# Altium PCB Thunderscope_Rev5.3.PcbDoc (part 5 of 14)
Units mil, origin at the board's own origin, x right, y up, seen from the top; angles counter-clockwise.
Board outline 3937.01 x 3838.58 mil, 6 copper layers (F.Cu, In1.Cu (GND), In2.Cu (Sign), In3.Cu (Sign), In4.Cu (GND), B.Cu), stack 60.556 mil thick; 911 components, 486 nets, 2834 pads, 2761 vias.
Unrouted connection lines stored in the file: 618.
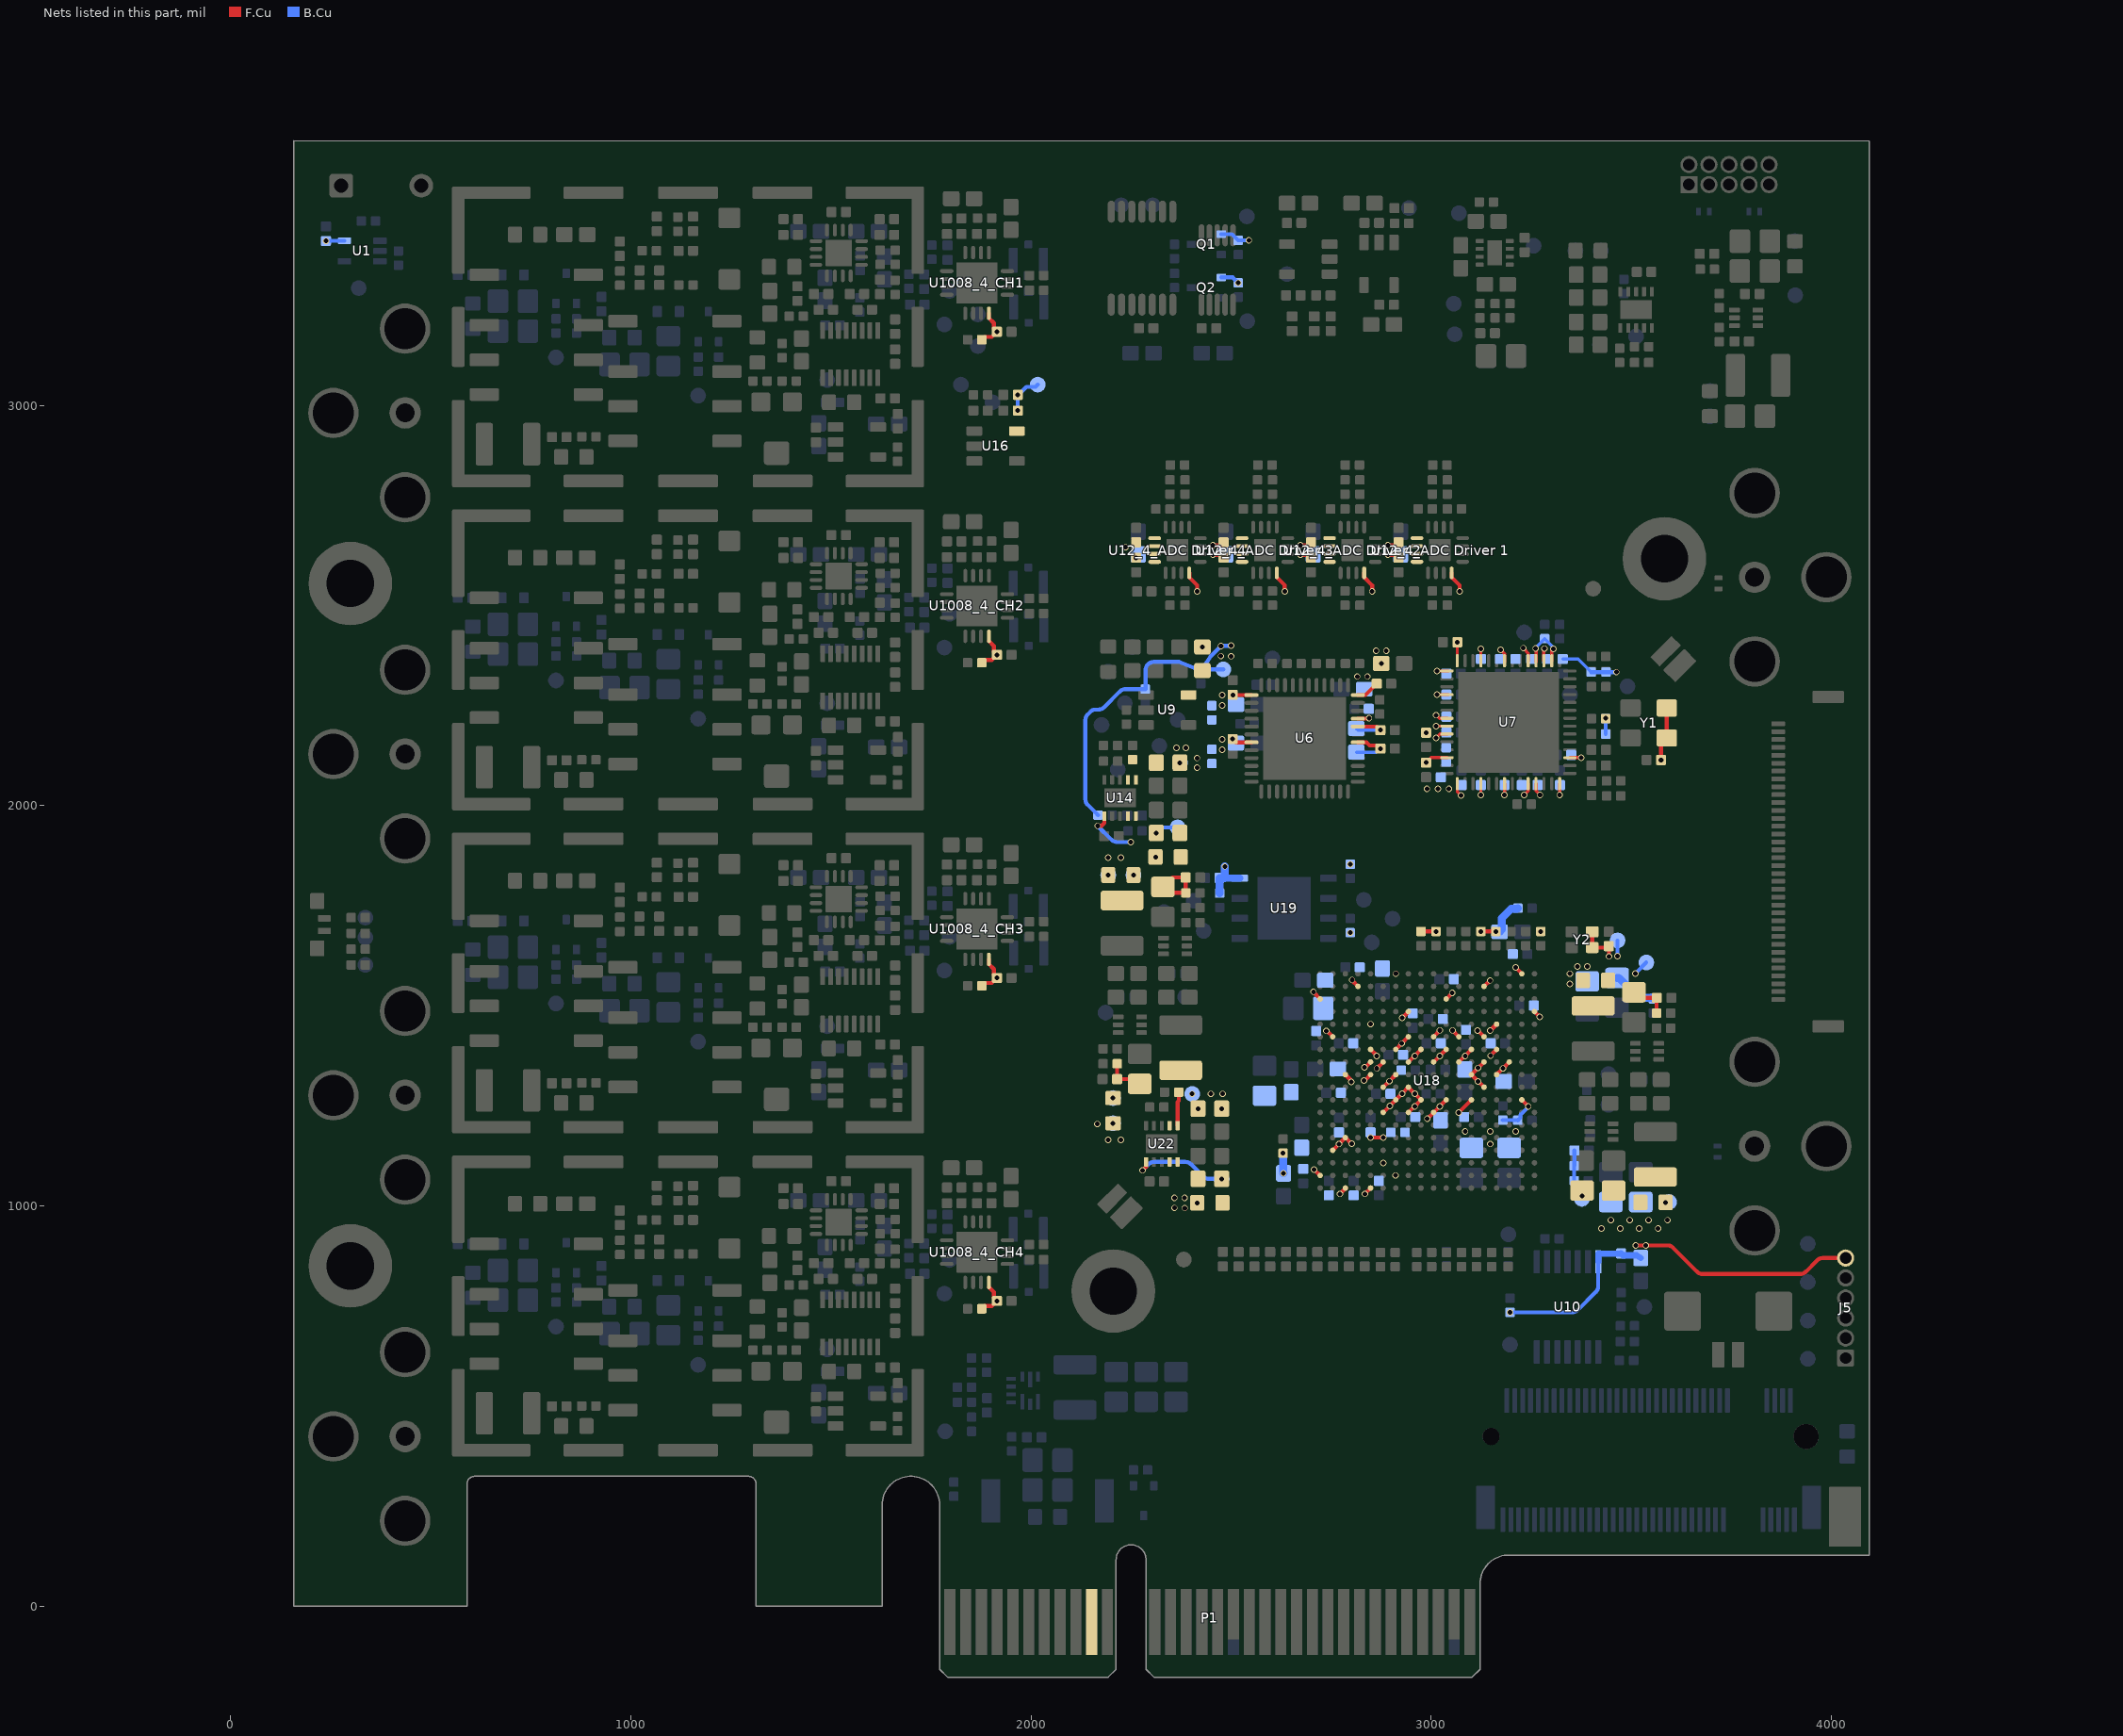
[diagram p8: the nets of this part, all layers, seen from the top]

## Via types
v1: diameter 16, hole 11.81, F.Cu to B.Cu, tented both sides, 2761 vias

## Nets (pads, with @x,y where several pads share a name; then routed paths per layer and width w, separated by ;. In a path a pad name is that pad's centre, name@x,y a point inside that pad or via, vN(x,y) a via of type N, cw(c..) or ccw(c..) an arc to the next point about the centre after c; other vN are vias at no path point) (continued)
+3V3_PGA: (continued)
  F.Cu w10: R1033_4_CH4.1@1877.95,737.2 1877.95,744.09 1883.78,749.92 1902.09,749.92 v1(1914.96,762.8) ; R1033_4_CH3.1@1877.95,1544.29 1877.95,1551.18 1883.78,1557.01 1902.09,1557.01 v1(1914.96,1569.88) ; R1033_4_CH2.1@1877.95,2351.38 1877.95,2358.27 1883.78,2364.09 1902.09,2364.09 v1(1914.96,2376.97) 1907.36,2384.57 1907.36,2398.9 U1008_4_CH2.12@1894.76,2411.5 ; R1033_4_CH1.1@1877.95,3158.46 1877.95,3165.35 1883.78,3171.18 1902.09,3171.18 v1(1914.96,3184.06) 1907.36,3191.65 1907.36,3205.98 1894.69,3218.66 U1008_4_CH1.12@1894.69,3230.32 ; U1008_4_CH3.12@1894.69,1616.14 1894.69,1604.49 1907.36,1591.81 1907.36,1577.48 v1(1914.96,1569.88) ; U1008_4_CH4.12@1894.76,797.32 1907.36,784.72 1907.36,770.39 v1(1914.96,762.8) ; C1043_4_CH4.1@1914.67,762.5 v1(1914.96,762.8) ; C1043_4_CH3.1@1914.67,1569.59 v1(1914.96,1569.88)
  B.Cu w10: v1(238.19,3411.02) 238.58,3411.42 U1.5@284.45,3411.42 ; v1(1966.93,2987.2) v1(1966.93,3026.57) ; v1@1968.08,3027.72 1969.7,3027.72 1988.52,3046.55 2011.11,3046.55 TP39.1@2016.73,3052.17 ; Q2.2@2475.39,3319.88 2503.94,3319.88 v1(2517.72,3306.1) ; Q1.2@2475.39,3428.15 2501.97,3428.15 R9.2@2517.72,3412.4 v1(2544.29,3412.4)
+3V3_R: C74.2 C75.2 L5.2 R55.1 R57.1 TP69.1 | length 140
  F.Cu w10: C75.2@3506.89,1533.91 3520.67,1520.13 C74.2@3563.58,1520.13 3562.99,1519.54 R55.1@3562.99,1481.74
  B.Cu w10: v1(3509.84,1580.71) TP69.1@3537.4,1608.27